# Altium PCB ESP32_HMI.PcbDoc
Units mm, origin at the board's own origin, x right, y up, seen from the top; angles counter-clockwise.
Board outline 93 x 70 mm, 2 copper layers (Top Layer, Bottom Layer); 93 components, 78 nets, 375 pads, 258 vias.
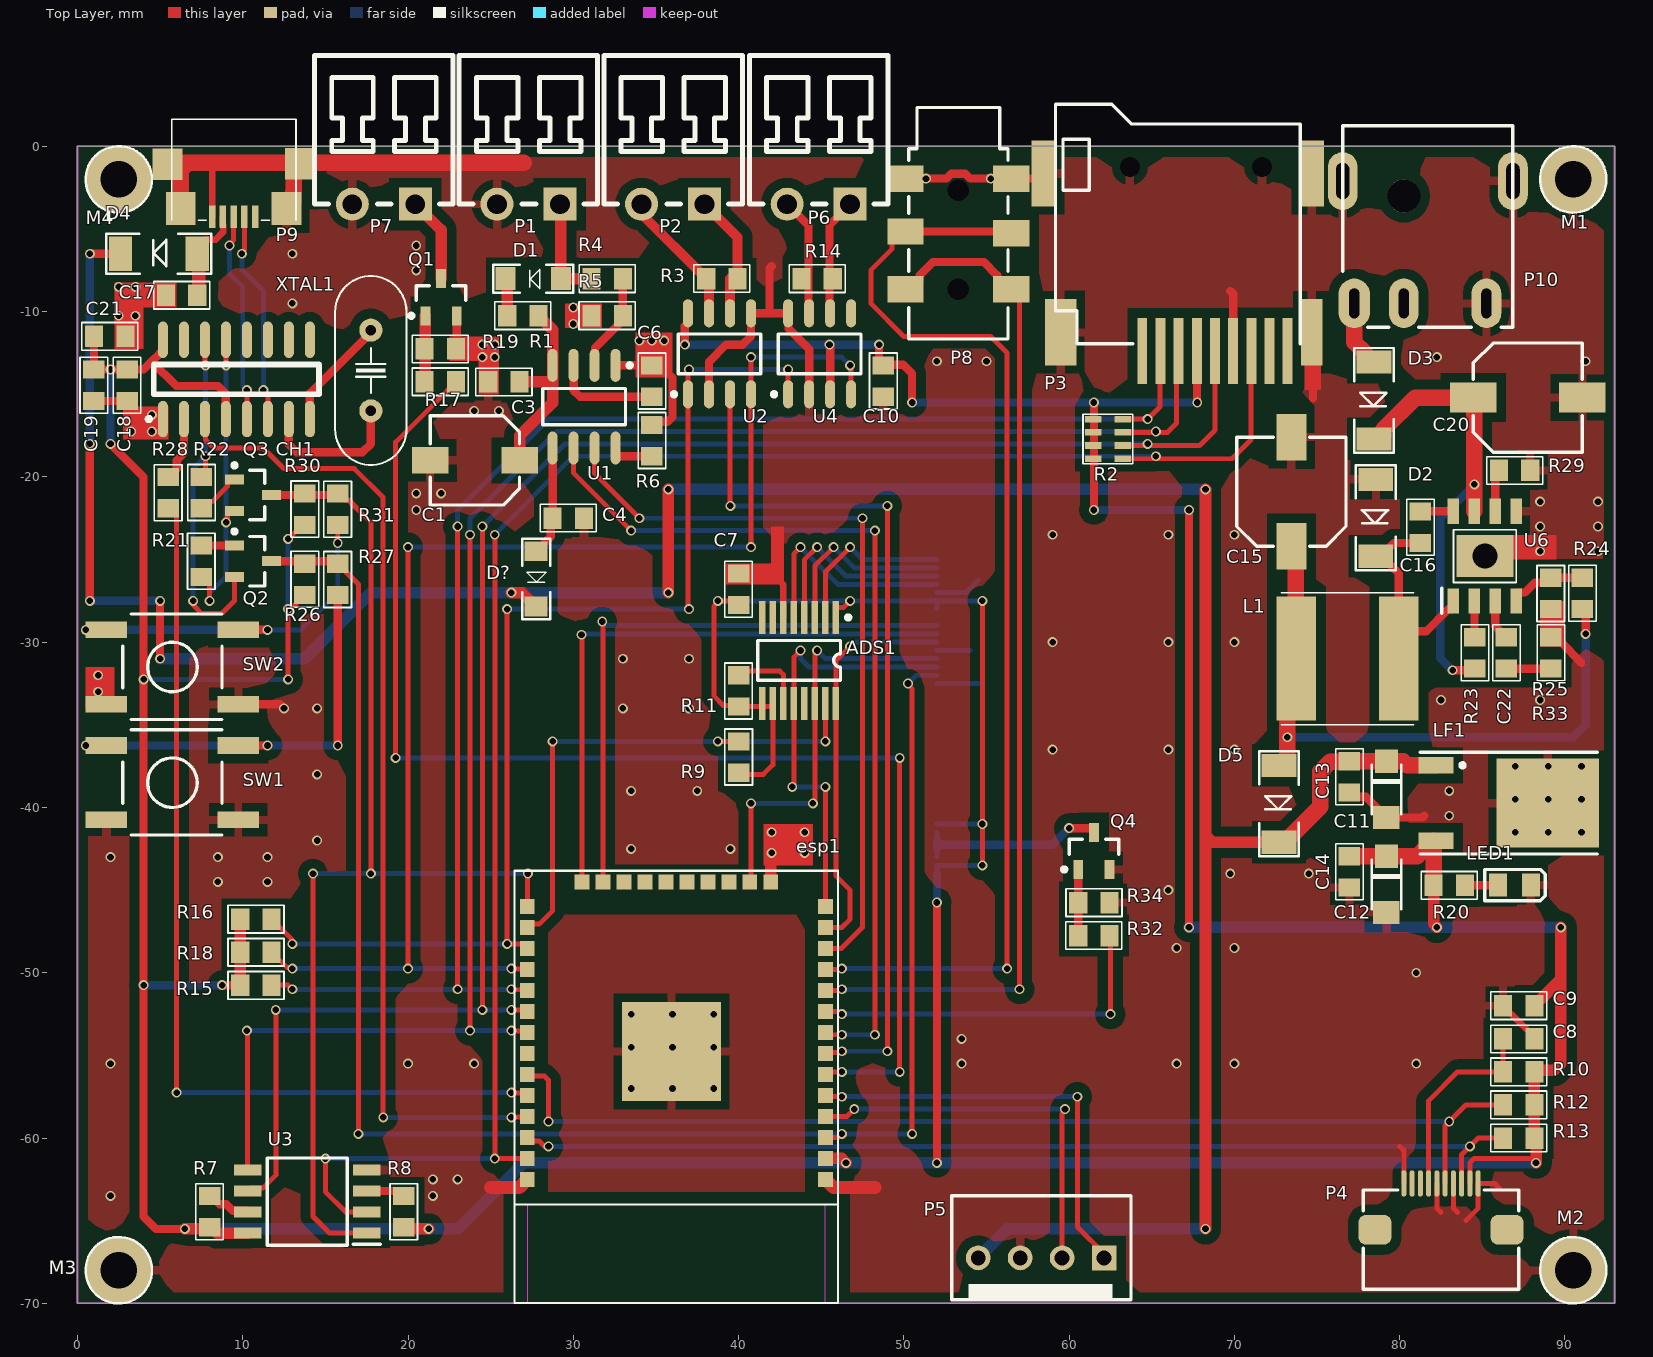
[diagram p0: Top Layer view]
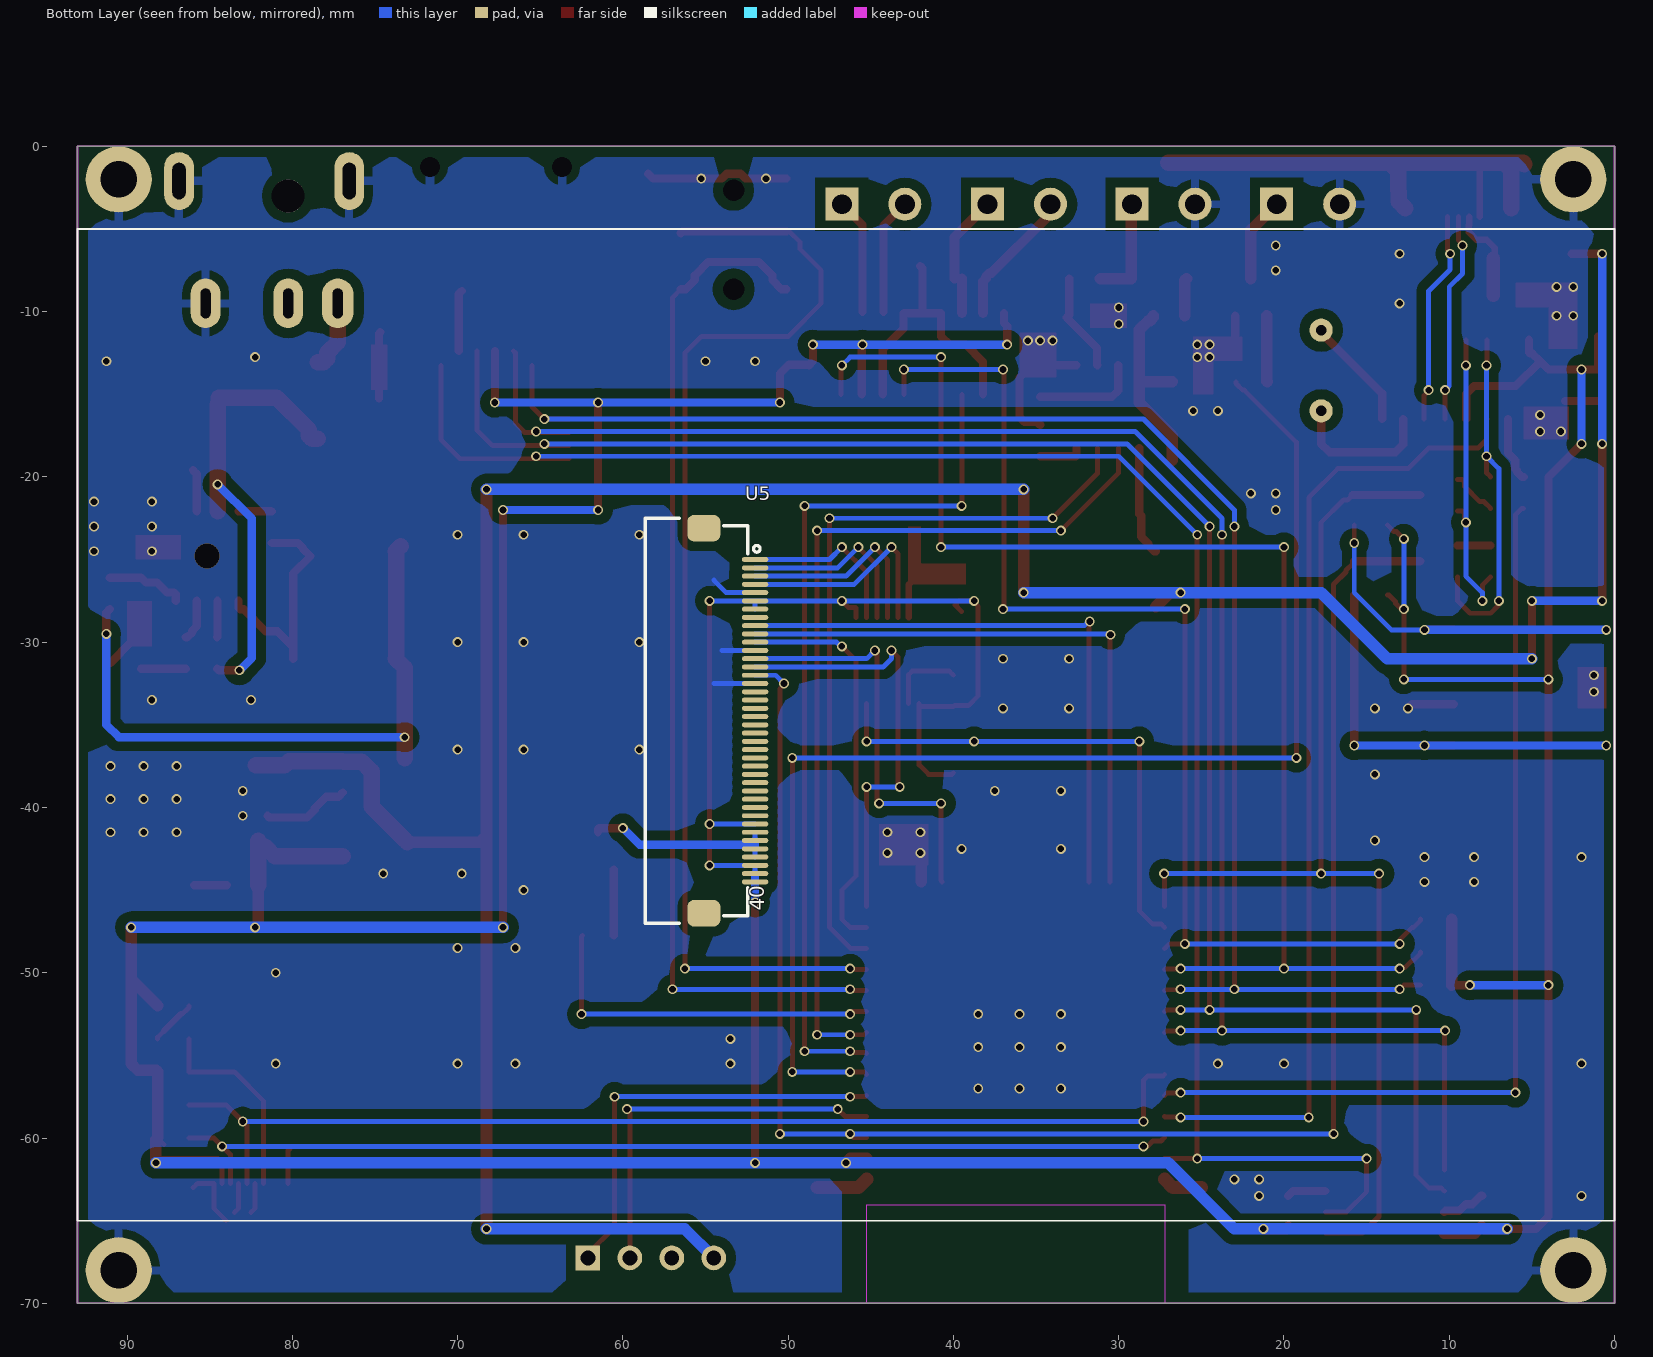
[diagram p1: Bottom Layer view, seen from below]
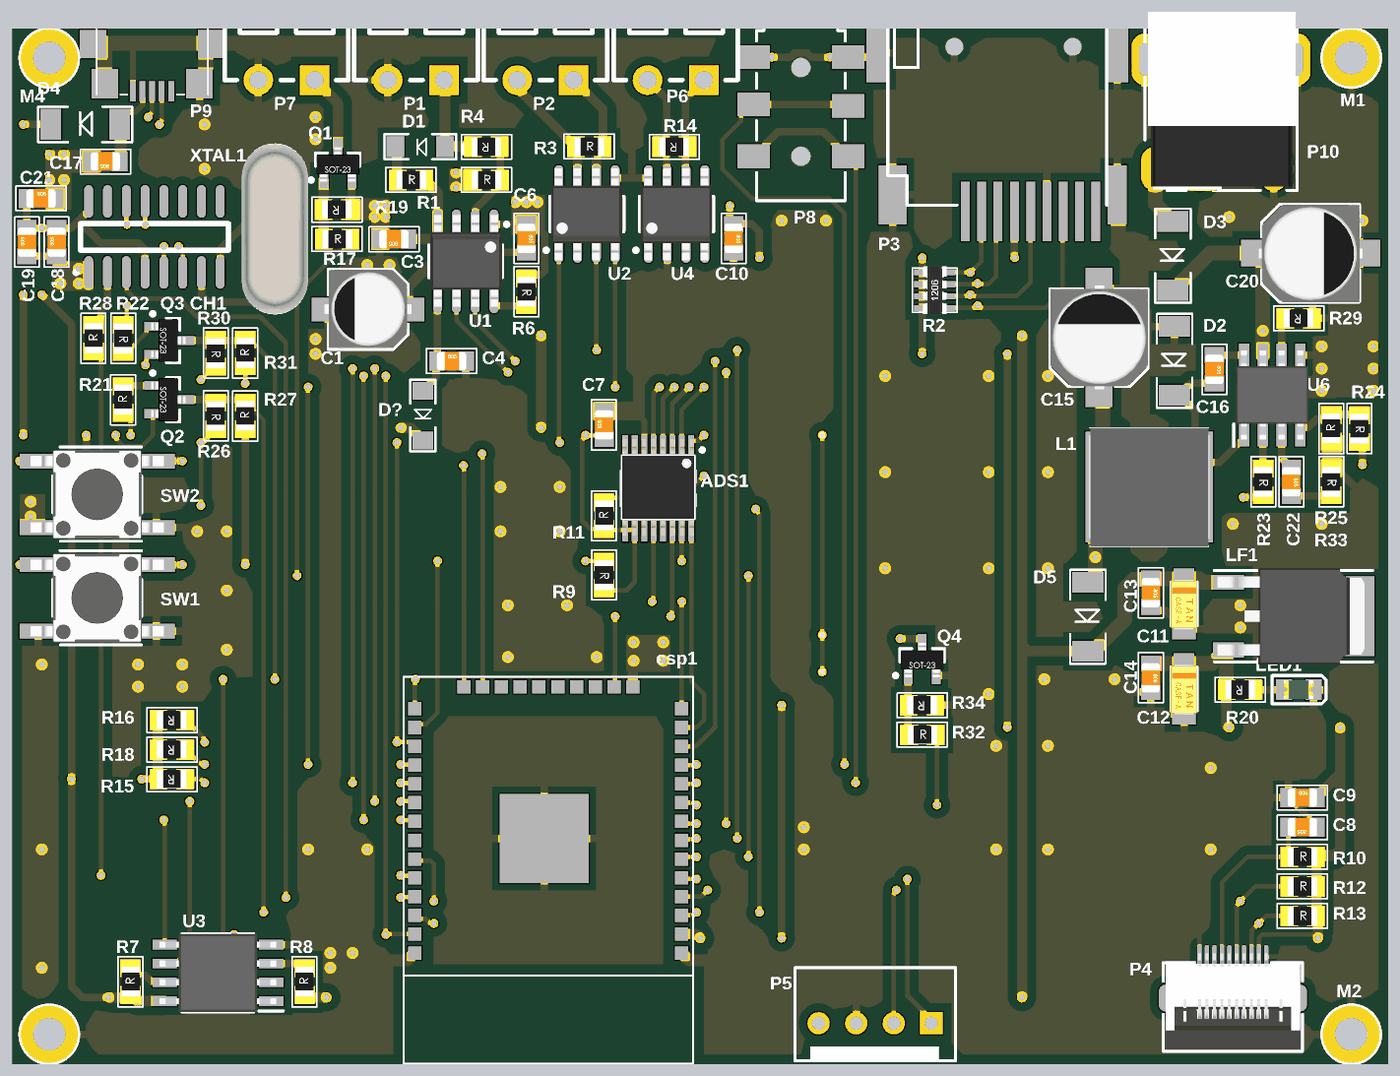
[diagram p2: 3D render of the assembled board from above, using the file's embedded part models]

## Layer stack, top to bottom
Top Solder: solder mask 0.0102, Solder Resist, Dk 3.5
Top Layer: signal copper 0.0356
Dielectric1: dielectric 0.32, FR-4, Dk 4.8
Bottom Layer: signal copper 0.0356
Bottom Solder: solder mask 0.0102, Solder Resist, Dk 3.5

## Board outline
0,-70 93,-70 93,0 0,0

## Design rules (kind name [scope] priority, off if disabled: settings)
Clearance [All] p1: gap=0.6 ignorepadtopadclearanceinfootprint=FALSE
FabricationTestPointUsage TestPointUsage [All] p1: valid=0 allowmultiple=FALSE
FabricationTestpoint Testpoint [All] p1: side=3 testpointundercomponent=TRUE minsize=1.016 maxsize=2.54 preferedsize=1.524 minholesize=0 maxholesize=1.016 preferedholesize=0.813 testpointgrid=0.025 allowsidetop=TRUE allowsidebottom=TRUE usegrid=TRUE gridtolerance=0
PolygonConnect [All] p1: thpad.connectstyle=Relief thpad.reliefconductorwidth=0.5 thpad.reliefentries=4 thpad.polygonreliefangle="90 Angle" thpad.airgapwidth=0.5 smdpad.connectstyle=Relief smdpad.reliefconductorwidth=0.5 smdpad.reliefentries=4 smdpad.polygonreliefangle="90 Angle" smdpad.airgapwidth=0.5 via.connectstyle=Direct via.reliefconductorwidth=0.254 via.reliefentries=4 via.polygonreliefangle="90 Angle" via.airgapwidth=0.254
RoomDefinition ESP32_HMI [InComponentClass('ESP32_HMI')] p1: confinementstyle=ConfineIn formatcopy=TRUE lockcomponents=FALSE outline -48.768,-116.883 2.032,-116.883 2.032,-91.483 -48.768,-91.483
RoutingVias [All] p1: holewidth=0.5 width=0.5 viastyle="Through Hole" minholewidth=0.2 minwidth=0.2 maxholewidth=10 maxwidth=10
SilkToSolderMaskClearance SilkscreenOverComponentPads [IsPad] p1: minsilkscreentomaskgap=0.254 clearancetoexposedcopper=TRUE
SolderMaskExpansion [All] p1: expansion=0.102 istentingtop=FALSE
Width [All] p1: maxlimit=10 minlimit=0.1 preferedwidth=0.5
27 further rules are at their usual default settings.

## Components (designator, comment, footprint, x,y, rotation, side; value= is the part's Value field where it differs from the comment)
ADS1 "ADS7846E" DBQ016 43.663,-31.1 r180 top
C1 "33uf" "CAP ELEC_TYPE-C" 24.05,-19 r90 top
C3 "10nF" "CAP 0805" 25.8,-14.25 r180 top
C4 "100nF" "CAP 0805" 29.7,-22.5 r0 top
C6 "100nF" "CAP 0805" 34.75,-14.2 r270 top
C7 "100nF" SMD_CAP_0805 40,-26.8 r90 top
C8 "100nF" "CAP 0805" 87.2,-54 r180 top
C9 "100nF" "CAP 0805" 87.2,-52 r0 top
C10 "100nF" "CAP 0805" 48.75,-14.2 r270 top
C11 "10uf" "CAP TAN_TYPE-A" 79.2,-38.9 r270 top
C12 "10uf" "CAP TAN_TYPE-A" 79.2,-44.65 r270 top
C13 "10nF" "CAP 0805" 76.95,-38.15 r270 top
C14 "100nF" "CAP 0805" 76.95,-43.9 r270 top
C15 "47uf" "CAP ELEC_TYPE-D&D8" 73.45,-20.9 r0 top
C16 "100nF" "CAP 0805" 81.25,-23.05 r270 top
C17 "10UF" SMD_CAP_0805 6.3,-9 r180 top
C18 "10uf" SMD_CAP_0805 3,-14.45 r90 top
C19 "100nF" SMD_CAP_0805 1,-14.45 r90 top
C20 "220uf" "CAP ELEC_TYPE-D&D8" 87.75,-15.2 r270 top
C21 "100nF" SMD_CAP_0805 1.95,-11.5 r0 top
C22 "220pF" "CAP 0805" 86.45,-30.65 r270 top
CH1 "CH340C" 751B-03_N 9.615,-14.1 r90 top
D1 "1N4148_SMD" SOD-80 29.25,-8 r180 top
D2 "SS14" SMA 78.55,-20.15 r270 top
D3 "SS14" SMA 78.45,-13.05 r270 top
D4 "SS14" SMA 7.25,-6.5 r180 top
D5 "SS14" SMA 72.7,-37.45 r270 top
D? "1N4148_SMD" SOD-80 27.75,-24.5 r270 top
esp1 "ESP32S_Module" ESP32S 45.25,-44.466 r180 top
L1 "10uH" "IND 23" 76.85,-31 r180 top
LED1 "LED-G" LED_G_0805 86.95,-44.7 r0 top
LF1 "LF33" TO-252 85.575,-39.735 r270 top
M1 "Screw" "Board Screw_No Silk" 90.5,-2 r0 top
M2 "Screw" "Board Screw_No Silk" 90.5,-68 r0 top
M3 "Screw" "Board Screw_No Silk" 2.5,-68 r0 top
M4 "Screw" "Board Screw_No Silk" 2.5,-2 r0 top
P1 "PTR2-R3.81" PTR2R-3.81 29.19,-3.5 r180 top
P2 "PTR2-R3.81" PTR2R-3.81 37.94,-3.5 r180 top
P3 "MICRO_SD-SOCKET" MICRO_SD 64.425,-12.375 r0 top
P4 "FPC_0.5mm_10" FPC50_10 82.5,-62.75 r180 top
P5 "SIG-4M" SIG4M 62.12,-67.25 r180 top
P6 "PTR2-R3.81" PTR2R-3.81 46.75,-3.5 r180 top
P7 "PTR2-R3.81" PTR2R-3.81 20.44,-3.5 r180 top
P8 "PJ313_3.5mm_JACK_STEREO" PJ-313 50.3,-11.65 r0 top value=?
P9 "USB MICRO" MICRO_USB 10.75,-4.25 r180 top
P10 "POWER JACK2" POWER10 80.25,-9.5 r270 top
Q1 "2N3904" SOT23 22,-9.125 r90 top
Q2 "2N3904" SOT23 10.625,-25.1 r0 top
Q3 "2N3904" SOT23 10.625,-21.1 r0 top
Q4 "2N3904" SOT23 61.5,-42.625 r90 top
R1 "560R" "RES 0805" 26.95,-10.25 r0 top
R2 "1K" "RES ARRAY 1206" 62.35,-17.7 r90 top
R3 "120R" "RES 0805" 38.99,-8 r0 top
R4 "22R" "RES 0805" 32.05,-8 r180 top
R5 "2.2M" "RES 0805" 32.05,-10.25 r0 top
R6 "100R" "RES 0805" 34.75,-17.8 r270 top
R7 "10K" "RES 0805" 8,-64.45 r90 top
R8 "10K" "RES 0805" 19.75,-64.45 r90 top
R9 "1K" "RES 0805 (2012X06L)" 40,-36.95 r270 top
R10 "10K" "RES 0805" 87.2,-56 r0 top
R11 "10K" "RES 0805 (2012X06L)" 40,-32.95 r90 top
R12 "10K" "RES 0805" 87.2,-58 r0 top
R13 "10K" "RES 0805" 87.2,-60 r0 top
R14 "120R" "RES 0805" 44.75,-8 r180 top
R15 "33k" "RES 0805" 10.8,-50.75 r180 top
R16 "33k" "RES 0805" 10.8,-46.75 r180 top
R17 "1k" "RES 0805" 21.95,-14.25 r0 top
R18 "33k" "RES 0805" 10.8,-48.75 r180 top
R19 "10k" "RES 0805" 21.95,-12.25 r180 top
R20 "1K" "RES 0805" 83,-44.7 r180 top
R21 "12k" "RES 0805" 7.5,-25.1 r90 top
R22 "12k" "RES 0805" 7.5,-20.95 r270 top
R23 "100K" "RES 0805" 84.55,-30.65 r270 top
R24 "150K" "RES 0805" 91.05,-27.05 r270 top
R25 "39K" "RES 0805" 89.15,-27.05 r90 top
R26 "12k" "RES 0805" 13.75,-26.2 r270 top
R27 "470" "RES 0805" 15.75,-26.2 r90 top
R28 "470" "RES 0805" 5.5,-20.95 r90 top
R29 "200K" "RES 0805" 86.95,-19.6 r180 top
R30 "12k" "RES 0805" 13.75,-21.95 r270 top
R31 "470" "RES 0805" 15.75,-21.95 r90 top
R32 "1k" "RES 0805" 61.5,-47.75 r0 top
R33 "68.1" "RES 0805" 89.15,-30.65 r270 top
R34 "10k" "RES 0805" 61.5,-45.75 r180 top
SW1 "Switch rst" SW-PB 5.742,-38.5 r180 top
SW2 "Switch prog" SW-PB 5.742,-31.5 r180 top
U1 "HT45B000X" SO8_NARROW_N 30.655,-15.75 r270 top
U2 "MAX485ESA" "SO8_NARROW_L - duplicate" 38.845,-12.55 r90 top
U3 "W25Q16BVSSIG" SOIC-8N 13.9,-63.845 r180 top
U4 "MCP2551-E/SN" "SO8_NARROW_L - duplicate" 44.905,-12.55 r90 top
U5 "TFT_LCD_4_INCH" TFT_LCD_40PIN_BUTTOM 52,-25 r90 bottom locked
U6 "MP1584EN-LF" SOIC8E 85.155,-24.788 r90 top
XTAL1 "12.000 MHz" "XTAL Small" 17.75,-13.56 r270 top

## Footprints (in the part's own frame and the unit in brackets; to place one, negate y for a bottom-side part, rotate by r counter-clockwise, add the part's x,y. Pads: shape width x height; smd on the part's side, far side on the other; paste and mask are expansions set on the pad)
751B-03_N [mm] "SOIC, 16-Leads, Body 9.9x3.9mm, Pitch 1.27mm, IPC Medium Density"
  oval 2.2x0.6 smd: 1(-2.4,4.445) 2(-2.4,3.175) 3(-2.4,1.905) 4(-2.4,0.635) 5(-2.4,-0.635) 6(-2.4,-1.905) 7(-2.4,-3.175) 8(-2.4,-4.445) 9(2.4,-4.445) 10(2.4,-3.175) 11(2.4,-1.905) 12(2.4,-0.635) 13(2.4,0.635) 14(2.4,1.905) 15(2.4,3.175) 16(2.4,4.445)
  silkscreen extent -2.52,-5 0.9,5.42, body extent -1.95,-4.95 1.95,4.95, height 1.75
"Board Screw_No Silk" [mm]
  round 4 hole 2.2 mask+0.1: S(0,0)
  silkscreen extent -2.01,-2.01 2.01,2.01
"CAP 0805" [mm]
  rect 1.1x1.3 smd: 1(-0.95,0) 2(0.95,0)
  silkscreen extent -1.7,-0.83 1.69,0.84, body extent -1,-0.62 1,0.62, height 0.78
"CAP ELEC_TYPE-C" [mm]
  rect 1.6x2.2 smd: 1(0,-2.7) 2(0,2.7)
  silkscreen extent -2.7,-2.7 2.7,2.7, body extent -2.63,-2.95 2.67,2.95, height 5.41
"CAP ELEC_TYPE-D&D8" [mm]
  rect 1.8x2.8 smd: 1(0,-3.3) 2(0,3.3)
  silkscreen extent -3.3,-3.3 3.3,3.3, body extent -3.27,-3.5 3.33,3.5, height 5.41
"CAP TAN_TYPE-A" [mm]
  rect 1.4x1.4 smd: 1(-1.7,0)
  rect 1.4x1.6 smd: 2(1.7,0)
  silkscreen extent -1.5,-0.9 1.5,0.9, body extent -1.65,-0.9 1.75,0.9, height 1.8
DBQ016 [mm] "SSOP; 16 Leads; Body Width 3.9 mm; Pitch 0.635 mm"
  rect 0.4x2 smd: 1(-2.222,-2.6) 2(-1.587,-2.6) 3(-0.952,-2.6) 4(-0.317,-2.6) 5(0.318,-2.6) 6(0.953,-2.6) 7(1.588,-2.6) 8(2.223,-2.6) 9(2.222,2.6) 10(1.587,2.6) 11(0.952,2.6) 12(0.317,2.6) 13(-0.318,2.6) 14(-0.953,2.6) 15(-1.588,2.6) 16(-2.223,2.6)
  silkscreen extent -3.1,-2.72 2.5,1.2, body extent -2.55,-3.32 2.55,3.18, height 1.06
ESP32S [mm] "ESP32S-Module"
  rect 0.9x0.9 smd: 1(0,18.034) 2(0,16.764) 3(0,15.494) 4(0,14.224) 5(0,12.954) 6(0,11.684) 7(0,10.414) 8(0,9.144) 9(0,7.874) 10(0,6.604) 11(0,5.334) 12(0,4.064) 13(0,2.794) 14(0,1.524) 15(3.3,0.034) 16(4.57,0.034) 17(5.84,0.034) 18(7.11,0.034) 19(8.38,0.034) 20(9.65,0.034) 21(10.92,0.034) 22(12.19,0.034) 23(13.46,0.034) 24(14.73,0.034) 25(18.034,1.524) 26(18.034,2.794) 27(18.034,4.064) 28(18.034,5.334) 29(18.034,6.604) 30(18.034,7.874) 31(18.034,9.144) 32(18.034,10.414) 33(18.034,11.684) 34(18.034,12.954) 35(18.034,14.224) 36(18.034,15.494) 37(18.034,16.764) 38(18.034,18.034)
  rect 6x6 smd: 101(9.3,10.3)
  Keep-Out Layer region: 0,19.558 18.034,19.558 18.034,25.527 0,25.527
  silkscreen extent -0.76,-0.64 18.8,25.53, body extent 0,0 18.03,25.53, height 2
FPC50_10 [mm] "FPC, 0.50mm, SMT,RA Bot. Contact, WE 687110149022"
  oval 0.3x1.6 smd mask+0.05: 1(2.25,0) 2(1.75,0) 3(1.25,0) 4(0.75,0) 5(0.25,0) 6(-0.25,0) 7(-0.75,0) 8(-1.25,0) 9(-1.75,0) 10(-2.25,0)
  rrect50% 2x1.8 smd: ""(-4,2.8) ""(4,2.8)
  silkscreen extent -4.7,0.4 4.7,6.4, body extent -4.55,-0.22 4.55,6.27, height 2.25
"IND 23" [mm]
  rect 2.4x7.5 smd: 1(-3.1,0) 2(3.1,0)
  silkscreen extent -4,-4 4,4, body extent -4.06,-4 4.06,4, height 6.6
LED_G_0805 [mm]
  rect 1.1x1.4 smd: 1(-1,0) 2(1,0)
  silkscreen extent -1.8,-0.95 1.85,0.95, body extent -1,-0.62 1,0.62, height 0.8
MICRO_SD [mm]
  rect 1.5x4 smd: 0(-5.95,10.725) 0(10.25,10.725)
  rect 1.9x4 smd: 0(-4.925,1.125)
  round 0 hole 1.2: 0(-0.75,11.125) 0(7.25,11.125)
  rect 1.3x4 smd: 0(10.25,1.125)
  rect 0.6x4 smd: 1(0,0) 2(1.1,0) 3(2.2,0) 4(3.308,0) 5(4.4,0) 6(5.5,0) 7(6.6,0) 8(7.7,0) 9(8.8,0)
  silkscreen extent -5.25,0.43 9.55,14.92
MICRO_USB [mm]
  rect 0.4x1.35 smd: 1(0,0) 2(0.65,0) 3(1.3,0) 4(1.95,0) 5(2.6,0)
  rect 1.8x1.9 smd: 6(-2.7,-3.2) 6(5.3,-3.175)
  rect 1.8x2 smd: 6(-1.9,-0.5) 6(4.5,-0.5)
  silkscreen extent -2.47,-5.9 5.05,0.23
PJ-313 [mm]
  round 1 hole 1.3: 0(3,3) 0(3,9)
  rect 2.2x1.6 smd: 1(-0.2,9.7) 1(6.2,9.7) 2(-0.2,6.5) 2(6.2,6.4) 3(-0.2,3) 3(6.2,3)
  silkscreen extent 0,0 6,14, body extent 0,0 6,14, height 5
POWER10 [mm]
  oval 3.5x1.8 hole 0.8 slot 2.2 at 0 deg: 1(-7.4,6.6) 1(-7.4,-3.7)
  oval 3x1.8 hole 0.6 slot 1.8 at 0 deg: 1(0,5) 2(0,0)
  oval 3x1.9 hole 0.6 slot 1.8 at 0 deg: 3(0,-3)
  oval 2x1.9 hole 2: 4(-6.5,0)
  silkscreen extent -10.75,-3.7 1.45,6.6, body extent -10.6,-3.5 1.5,6.5, height 7.2
PTR2R-3.81 [mm]
  rect 2x2 hole 1.2: 1(0,0)
  round 2 hole 1.2: 2(3.81,0)
  silkscreen extent -2.28,-9 6.09,0
"RES 0805" [mm] "Chip Resistor, 2-Leads, Body 2.0x1.3mm, IPC High Density _ (0.100 W)"
  rect 1.1x1.3 smd: 1(-0.95,0) 2(0.95,0)
  silkscreen extent -1.7,-0.83 1.69,0.84, body extent -1.49,-0.7 1.51,0.7, height 0.53
"RES 0805 (2012X06L)" [mm] "Chip Resistor, 2-Leads, Body 2.0x1.3mm, IPC High Density _ (0.100 W)"
  rect 1.1x1.3 smd: 1(-0.95,0) 2(0.95,0)
  silkscreen extent -1.7,-0.83 1.69,0.84, body extent -1.49,-0.7 1.51,0.7, height 0.53
"RES ARRAY 1206" [mm]
  rect 0.4x1 smd: 1(-1.2,-0.9) 2(-0.4,-0.9) 3(0.4,-0.9) 4(1.2,-0.9) 5(1.2,0.9) 6(0.4,0.9) 7(-0.4,0.9) 8(-1.2,0.9)
  silkscreen extent -1.5,-1.51 1.49,1.51, body extent -1.6,-0.8 1.6,0.8, height 0.5
SIG4M [mm]
  rect 1.5x1.5 hole 0.9: 1(0,0)
  round 1.5 hole 0.9: 2(2.54,0) 3(5.08,0) 4(7.62,0)
  silkscreen extent -1.62,-3.76 9.23,2.54
SMA [mm]
  rect 1.4x2.1 smd: 1(0,0) 2(4.65,0)
  silkscreen extent -0.85,-1.2 5.5,1.2
SMD_CAP_0805 [mm]
  rect 1.1x1.3 smd: 1(-0.95,0) 2(0.95,0)
  silkscreen extent -1.7,-0.83 1.69,0.84, body extent -1,-0.62 1,0.62, height 0.78
"SO8_NARROW_L - duplicate" [mm] "8-Pin Small Outline Package (SO8), IPC High Density"
  oval 1.7x0.6 smd: 1(-2.45,1.905) 2(-2.45,0.635) 3(-2.45,-0.635) 4(-2.45,-1.905) 5(2.45,-1.905) 6(2.45,-0.635) 7(2.45,0.635) 8(2.45,1.905)
  silkscreen extent -2.57,-2.5 1.2,2.88, body extent -3.12,-2.39 3.07,2.44, height 1.7
SO8_NARROW_N [mm] "8-Pin Small Outline Package (SO8), IPC Medium Density"
  oval 2x0.6 smd: 1(-2.5,1.905) 2(-2.5,0.635) 3(-2.5,-0.635) 4(-2.5,-1.905) 5(2.5,-1.905) 6(2.5,-0.635) 7(2.5,0.635) 8(2.5,1.905)
  silkscreen extent -2.62,-2.5 1.1,2.88, body extent -3.12,-2.39 3.07,2.44, height 1.7
SOD-80 [mm]
  rect 1.2x1.4 smd: 1(0,0) 2(3.35,0)
  silkscreen extent -0.75,-0.85 4.1,0.85
SOIC8E [mm]
  rect 1.525x0.7 smd: 1(-2.712,1.905) 2(-2.712,0.635) 3(-2.712,-0.635) 4(-2.712,-1.905) 5(2.712,-1.905) 6(2.712,-0.635) 7(2.712,0.635) 8(2.712,1.905)
  rect 2.56x3.45 smd: 9(0,0)
  silkscreen extent -3.47,-1.9 1.6,2.61, body extent -3,-2.45 3,2.45, height 1.7
SOIC-8N [mm]
  rect 1.65x0.65 smd: 1(-3.6,1.905) 2(-3.6,0.635) 3(-3.6,-0.635) 4(-3.6,-1.905) 5(3.6,-1.905) 6(3.6,-0.635) 7(3.6,0.635) 8(3.6,1.905)
  silkscreen extent -4.43,-2.64 2.42,2.64, body extent -3.95,-2.64 3.95,2.64, height 2.16
SOT23 [mm] "SOT23, 3-Leads, Body 2.9x1.3mm, Pitch 0.95mm, Lead Span 2.4mm, IPC Medium Density"
  rect 1.15x0.6 smd: 1(-1.125,0.95) 2(-1.125,-0.95) 3(1.125,0)
  silkscreen extent -1.25,-1.5 0.7,1.92, body extent -1.23,-1.45 1.07,1.45, height 1
SW-PB [mm]
  rect 2.5x1 smd: 1(-3.992,2.25) 1(3.992,2.25) 2(-3.992,-2.25) 2(3.992,-2.25)
  silkscreen extent -3,-3.2 3,3.18, body extent -4.5,-3 4.5,3, height 5
TFT_LCD_40PIN_BUTTOM [mm] "FPC, FH12 Series; 40 Position; 0.5mm, Top Contact"
  oval 0.3x1.6 smd mask+0.05: 1(0,0) 2(-0.5,0) 3(-1,0) 4(-1.5,0) 5(-2,0) 6(-2.5,0) 7(-3,0) 8(-3.5,0) 9(-4,0) 10(-4.5,0) 11(-5,0) 12(-5.5,0) 13(-6,0) 14(-6.5,0) 15(-7,0) 16(-7.5,0) 17(-8,0) 18(-8.5,0) 19(-9,0) 20(-9.5,0) 21(-10,0) 22(-10.5,0) 23(-11,0) 24(-11.5,0) 25(-12,0) 26(-12.5,0) 27(-13,0) 28(-13.5,0) 29(-14,0) 30(-14.5,0) 31(-15,0) 32(-15.5,0) 33(-16,0) 34(-16.5,0) 35(-17,0) 36(-17.5,0) 37(-18,0) 38(-18.5,0) 39(-19,0) 40(-19.5,0)
  rrect50% 1.6x2 smd: ""(-21.4,3.1) ""(1.9,3.1)
  silkscreen extent -22,-0.3 2.5,6.64, body extent -22,-0.3 2.5,6.7, height 2.05
TO-252 [mm] "D-PAK/TO-252-AA; 3 Leads (1 Cropped); Body 10.1 (inc. leads) x 6.6 mm (LxW max)"
  rect 1x2.1 smd: 1(-2.285,-3.375) 3(2.285,-3.375)
  rect 5.4x6.2 smd: 4(0,3.375)
  silkscreen extent -3.08,-4.32 3.09,6.38, body extent -3.27,-4.11 3.27,5.83, height 2.39
"XTAL Small" [mil]
  round 55 hole 25: 1(-96.06,0) 2(96.06,0)
  silkscreen extent -225,-85 225,85, body extent -226,-89 226,89, height 140

## Part data
ADS1: "4-Wire Touch Screen Controller, 16-Pin SSOP", Code_JEDEC=MO-137-AB, ComponentLink1Description="Manufacturer Link", ComponentLink1URL=http://focus.ti.com/docs/prod/folders/print/ads7846.html, ComponentLink2Description=Datasheet, ComponentLink2URL=http://focus.ti.com/lit/ds/symlink/ads7846.pdf, DatasheetVersion=Jan-2005, PackageDescription="SSOP; 16 Leads; Body Width 3.9 mm; Pitch 0.635 mm", PackageReference=DBQ016, PackageVersion=Feb-2005, Published=6-Oct-2005, Publisher="Altium Limited"
C1 C11 C12: library part "CAPACITOR POLAR", "Polar Capacitor", Voltage=100V, Adding Date=1398/04/17, Designer="Amin lezgi"
C3 C4 C6 C8 C9 C10 C13 C14 C16 C22: library part "CAPACITOR BIPOLAR", "Bipolar Capacitor", Adding Date=1398/5/7, Designer="Amin Lezgi"
C7 C17 C18 C19 C21: library part Cap-Bipolar, "Bipolar Capacitor", Voltage=100V, Adding Date=1387/12/20, Designer="Saeid Jorablo", Organazation=ControTec
C15 C20: library part "CAPACITOR POLAR", "Polar Capacitor", Voltage=16V, Adding Date=1398/04/17, Designer="Amin lezgi"
CH1: library part CH340G
D2 D3 D4 D5: library part SS14_SMD, "SCHOTTKY DIODE_SMA", LatestRevisionDate=08-Jul-2005, LatestRevisionNote="Mech Layer 1 removed.", PackageReference=LED-0, Published=8-Jun-2000, Publisher="Altium Limited"
esp1: "Esp-32S", Datasheet=https://espressif.com/sites/default/files/documentation/esp_wroom_32_datasheet_en.pdf
L1: library part INDUCTOR
LED1: library part LED_SMD_GREEN, "LED_SMD", LatestRevisionDate=08-Jul-2005, LatestRevisionNote="Mech Layer 1 removed.", PackageReference=LED-0, Published=8-Jun-2000, Publisher="Altium Limited"
LF1: library part L78M05, "Precision 500mA Regulator"
M1 M2 M3 M4: library part "Board Screw", "Board Screw With Spacer"
P1 P2 P6 P7: library part PTR_RIGHT-2pin, "3.81mm"
P3: library part MICRO_SD
P4: library part FPC50_10, "CONN, FPC, 0.50mm pitch, RightAngle, Bot. Contact, Hinge type", DESC="LCD Touch", MANF="Wurth Elektronik", MANF_P#=687110149022
P5: "MALE"
P8: library part HEAD_PHONE_PJ313, "3.3mm audio jack stereo", PART NUMBER=?, Designer="amin lezgi"
P10: library part "POWER JACK", Designer=aminlezgi
Q1 Q2 Q3 Q4: library part "NPN BJT", Company="ADD COMPANY", Designer="AMIN LEZGI"
R1 R4 R5 R6 R7 R8 R10 R12 R13 R15 R16 R17 R18 R19 R20 R21 R22 R23 R26 R27 R28 R29 R30 R31 R32 R33 R34: library part RESISTOR, "RESISTOR", Power="1/8 W", Tolerance=5%
R2: library part "RESISTOR ARRAY"
R3 R14: library part RESISTOR, "RESISTOR", Power="1/8 W", Tolerance=1
R9 R11: library part Resistor, "Resistor", Power="1/8 W", Tolerance=5%
R24 R25: library part RESISTOR, "RESISTOR", Power="1/8 W", Tolerance=1%
SW1 SW2: library part "Switch PB", "Push Button Switch"
U1: "Complete Data Transmission on Power Line / functions", Designer="Amin Lezgi"
U2: "Low-Power, Slew-Rate-Limited RS-485/RS-422 Transceiver", Code_IPC=SOIC127P600-8, Code_JEDEC=MS-012-AA, ComponentLink1Description="Manufacturer Link", ComponentLink1URL=http://www.maxim-ic.com/, ComponentLink2Description=Datasheet, ComponentLink2URL=http://pdfserv.maxim-ic.com/en/ds/MAX1487-MAX491.pdf, DatasheetVersion=Feb-1996, LatestRevisionDate=13-Apr-2006, LatestRevisionNote="IPC-7351 Footprint Added.", PackageDescription="8-Pin Small Outline Integrated Circuit 1.27 mm Pitch", PackageReference=NSO8, Published=16-Jan-2001, Publisher="Altium Limited"
U3: library part W25Q16BVSSIG_TR, "Integrated Circuit", Manufacturer_Name=Winbond, Manufacturer_Part_Number="W25Q16BVSSIG TR", Mouser Part Number=N/A, Datasheet Link=https://media.digikey.com/pdf/Data%20Sheets/Winbond%20PDFs/W25Q16BV.pdf, Designer="amin lezgi", Height=2.16mm, Mouser Price/Stock=https://www.mouser.com/Search/Refine.aspx?Keyword=N%2FA
U4: "High-Speed CAN Transceiver, 8-Pin SOIC, Extended Temperature", Supplier Part Number 1=MCP2551-E/SN-ND, Code_IPC=SOIC127P600-8, Code_JEDEC=MS-012, ComponentLink1Description=Datasheet, ComponentLink1URL=http://ww1.microchip.com/downloads/en/DeviceDoc/21667E.pdf, ComponentLink2Description="Packaging Specification", ComponentLink2URL=http://www.microchip.com/stellent/groups/techpub_sg/documents/packagingspec/en012702.pdf, ComponentLink3Description="Microchip.com Home", ComponentLink3URL=http://www.microchip.com/, DatasheetVersion="revE, Jan-2007", PackageDescription="8-Lead Plastic Small Outline (SN) - Narrow, 3.90mm Body [SOIC]", PackageReference=SOIC-SN8, PackageVersion="revBB, Aug-2009", Published=29-Jan-2009, Publisher="Altium Limited", Supplier 1=Digi-Key, Supplier 2=Farnell, Supplier 3=Farnell, Supplier Part Number 2=1467746, Supplier Part Number 3=4687887
U5: "TFT LCD 4 inch - 320x480 With Touch - 3Line-SPI/4 Line-SPI/8bit/16bit interface ST7796S", MANF=Hirose, MANF_P#=FH12A-40S-0.5SH
U6: "Integrated Circuit", Manufacturer_Name="Monolithic Power Systems (MPS)", Mouser Part Number=946-MP1584ENLF, Arrow Part Number=MP1584EN-LF, Datasheet Link=https://componentsearchengine.com/Datasheets/1/MP1584EN-LF.pdf, Designer="amin lezgi", Height=1.7mm, Manufacturer_Part_Number=MP1584EN-LF, Mouser Price/Stock=https://www.mouser.com/Search/Refine.aspx?Keyword=946-MP1584ENLF
XTAL1: library part XTAL, "XTAL Crystal", Company=E.P.I.L, Design Date=11/04/2011
D1 D?: LatestRevisionDate=08-Jul-2005, LatestRevisionNote="Mech Layer 1 removed.", PackageReference=LED-0, Published=8-Jun-2000, Publisher="Altium Limited"

## Via types
v1: diameter 0.6, hole 0.4, Top Layer to Bottom Layer, 257 vias
v2: diameter 1.5, hole 1.5, Top Layer to Bottom Layer, 1 vias

## Nets (pads, with @x,y where several pads share a name; then routed paths per layer and width w, separated by ;. In a path a pad name is that pad's centre, name@x,y a point inside that pad or via, vN(x,y) a via of type N, cw(c..) or ccw(c..) an arc to the next point about the centre after c; other vN are vias at no path point)
#EN: esp1.3 Q2.3 R26.1 R27.2 U5.15 | length 103
  Top Layer w0.3: R27.2 15.85,-25.25 16.25,-25.65 16.25,-25.75 17,-26.5 v1(17,-59.75) ; esp1.3 46.04,-59.96 v1(46.25,-59.75) ; v1(50.25,-32.5) 50.25,-32.576 50.5,-32.826 v1(50.5,-59.75)
  Top Layer w0.5: Q2.3 R27.2@15.75,-25.1
  Bottom Layer w0.3: v1(17,-59.75) v1(46.25,-59.75) v1(50.5,-59.75) ; v1(50.25,-32.5) 50.75,-32 U5.15
+3.3V: ADS1.1 ADS1.9 ADS1.10 C7.1 C9.2 C10.1 C12.1 C14.1 C18.2 C19.2 C21.1 CH1.4 CH1.16 esp1.2 LF1.3 P3.4 P4.9 R2.5 R2.6 R2.7 R2.8 R7.1 R8.1 R9.2 R10.2 R11.1 R12.2 R13.2 R15.2 R16.2 R18.2 R20.2 R26.2 R30.2 U2.8 U3.8 U4.3 U5.6 U5.7 U5.33 U5.38 U5.39 U5.40 | length 400.5
  Top Layer w0.3: v1(12.75,-32.25) v1(12.75,-28) ; v1(12.75,-23.75) 13.2,-23.3 13.35,-23.3 R30.2 ; v1@12.957,-27.943 13.25,-27.65 13.25,-27.55 13.65,-27.15 R26.2 ; C7.1@39.5,-28.15 39.9,-27.75 39.65,-27.5 v1(38.75,-27.5) 38.75,-27.576 38.5,-27.826 38.5,-33.25 39.076,-33.826 39.926,-33.826 R11.1 42.025,-33.9 ADS1.10@42.075,-33.85 ; R9.2 40.1,-38 41.5,-38 42.075,-37.425 ADS1.10@42.075,-33.85 ; ADS1.10 ADS1.10@42.075,-33.85 ; ADS1.1 45.885,-27.941 45.935,-27.891 46.359,-27.891 v1(46.75,-27.5) ; v1(54.75,-43.5) v1(54.75,-41) v1(54.75,-27.5) ; P4.9 84.25,-61.5 84.5,-61.25 v1@88.25,-61.25 ; R13.2@87.75,-60.4 R13.2
  Top Layer w0.5: C21.1 C19.2 v1(2,-13.5) C18.2 4,-13.5 4.49,-13.01 ; v1(2,-18) 4,-20 v1(4,-32.25) v1(4,-50.75) 4,-64.75 4.75,-65.5 v1(6.5,-65.5) ; CH1.16 5.17,-12.473 5.124,-12.519 4.981,-12.519 4.49,-13.01 ; v1(8.75,-50.75) R15.2 ; CH1.4 8.98,-14.98 8.5,-14.5 5.981,-14.5 4.49,-13.01 ; v1(36.75,-12) 36.75,-10.867 36.94,-10.677 U2.8 ; v1(45.5,-12) 45.54,-12.04 U4.3 ; v1(48.5,-12) 48.5,-13 C10.1 48.793,-13.207 49.957,-13.207 50.5,-13.75 v1(50.5,-15.5) ; v1(52,-61.5) v1(52,-45.75) ; v1(61.5,-22) v1(61.5,-15.5) ; v1(67.25,-47.25) v1(67.25,-22) ; P3.4 67.733,-15.483 v1(67.75,-15.5)
  Top Layer w0.7: v1(6.5,-65.5) 7.9,-65.5 R7.1 8.1,-65.4 8.45,-65.75 U3.8 ; R15.2 R18.2 R16.2 ; R8.1 19.85,-65.5 v1(21.25,-65.5) ; esp1.2 45.252,-61.232 46.232,-61.232 v1(46.5,-61.5) ; R20.2 82.05,-47.05 v1(82.25,-47.25) ; C9.2 89.75,-50.4 ; v1(88.25,-61.5) 88.25,-61.25 88.25,-60.1 R13.2 R12.2 R10.2 88.24,-55.91 89.34,-55.91 89.75,-55.5 89.75,-50.4 ; v1(89.75,-47.25) 89.75,-50.4
  Top Layer w1: C14.1 C12.1 81.064,-42.95 LF1.3@81.65,-42.364 ; R20.2 LF1.3@82.05,-42.02
  Bottom Layer w0.3: v1(4,-32.25) v1(12.75,-32.25) ; v1(12.75,-28) v1(12.75,-23.75) ; v1(38.75,-27.5) v1(46.75,-27.5) 51.35,-27.5 U5.6 ; U5.39 U5.38 52.65,-43.5 v1(54.75,-43.5) ; U5.33 v1(54.75,-41) ; U5.7 U5.6 ; v1(54.75,-27.5) U5.6
  Bottom Layer w0.5: v1(2,-18) v1(2,-13.5) ; v1(4,-50.75) v1(8.75,-50.75) ; v1(36.75,-12) v1(45.5,-12) v1(48.5,-12) ; v1(50.5,-15.5) v1(61.5,-15.5) v1(67.75,-15.5) ; v1(52,-45.75) U5.40 U5.39 ; v1(61.5,-22) v1(67.25,-22)
  Bottom Layer w0.7: v1(6.5,-65.5) v1(21.25,-65.5) 23,-65.5 27,-61.5 v1(46.5,-61.5) v1(52,-61.5) v1(88.25,-61.5) ; v1(67.25,-47.25) v1(82.25,-47.25) v1(89.75,-47.25)
+5V: C15.1 D5.1 L1.2 R24.2 | length 38.6
  Top Layer w0.5: R24.2 91.25,-28.2 v1(91.25,-29.5)
  Top Layer w1: D5.1@73.2,-37.01 v1(73.2,-35.75) 73.2,-31.55 L1.2 ; C15.1 73.75,-24.5 73.7,-24.55 L1.2@73.7,-31
  Bottom Layer w0.5: v1(73.2,-35.75) 90.5,-35.75 91.25,-35 v1(91.25,-29.5)
+24V: D3.1 P10.3 | length 4.3
  Top Layer w1: P10.3 77.25,-11.85 77.9,-12.5 77.9,-12.85 78.1,-13.05 D3.1
"BL LED-": Q4.3 U5.34 U5.35 U5.36 U5.37 | length 11.6
  Top Layer w0.5: v1(60,-41.25) 61.45,-41.25 61.5,-41.3 Q4.3
  Bottom Layer w0.3: U5.37 U5.36 ; U5.35 U5.34
  Bottom Layer w0.5: U5.36 52,-42.25 ; U5.35 52,-42.25 ; v1(60,-41.25) 59,-42.25 52,-42.25
CAN1_RX: esp1.28 R18.1 U2.4 U4.4 | length 81.7
  Top Layer w0.3: R18.1 11.75,-48.85 12.15,-49.25 12.25,-49.25 12.693,-49.693 12.943,-49.693 v1(13,-49.75) ; v1(20,-49.75) v1(20,-24.25) ; v1(26.25,-49.75) 26.28,-49.78 27.196,-49.78 esp1.28 ; v1(40.75,-24.25) U2.4 v1(40.75,-12.75) ; U4.4 v1@46.81,-13.25
  Bottom Layer w0.3: v1(13,-49.75) v1(20,-49.75) v1(26.25,-49.75) ; v1(20,-24.25) v1(40.75,-24.25) ; v1(40.75,-12.75) 46.25,-12.75 v1(46.75,-13.25)
CAN1_TX: esp1.27 R16.1 U2.1 U4.1 | length 69.7
  Top Layer w0.3: R16.1 11.75,-46.85 12.15,-47.25 12.25,-47.25 12.943,-47.943 12.943,-48.193 v1(13,-48.25) ; v1(26,-28) v1(26,-48.25) 26.936,-48.25 esp1.27 ; v1(37,-28) 36.94,-27.94 U2.1 36.94,-13.641 37,-13.581 v1(37,-13.5) ; U4.1 v1(43,-13.5)
  Bottom Layer w0.3: v1(13,-48.25) v1(26,-48.25) ; v1(26,-28) v1(37,-28) ; v1(37,-13.5) v1(43,-13.5)
D_N: CH1.6 P9.2 | length 13
  Top Layer w0.3: v1(9.95,-6.5) 9.95,-6.419 10.1,-6.269 P9.2 ; v1(11.25,-14.75) 11.25,-14.794 11.52,-15.064 CH1.6
  Bottom Layer w0.3: v1(9.95,-6.5) 9.95,-7.45 11.25,-8.75 v1(11.25,-14.75)
D_P: CH1.5 P9.3 | length 12.8
  Top Layer w0.3: v1(9.2,-6) 9.2,-5.924 9.45,-5.674 P9.3 ; CH1.5 v1(10.25,-14.75)
  Bottom Layer w0.3: v1(9.2,-6) 9.2,-7.7 10,-8.5 10,-14.5 v1(10.25,-14.75)
DAC_1: esp1.10 P8.3 | length 62.5
  Top Layer w0.3: esp1.10 45.256,-51.064 46.105,-51.064 46.169,-51 v1(46.25,-51) ; P8.3@56.5,-8.65 57,-9.15 v1(57,-51)
  Top Layer w0.5: P8.3@50.1,-8.65 50.4,-8.65 50.95,-8.1 50.95,-7.8 51.75,-7 54.85,-7 55.65,-7.8 55.65,-8.1 56.2,-8.65 P8.3@56.5,-8.65
  Bottom Layer w0.3: v1(46.25,-51) v1(57,-51)
DAC_2: esp1.11 P8.2 | length 69.5
  Top Layer w0.3: esp1.11 46.2,-49.8 v1(46.25,-49.75) ; P8.2@50.1,-5.15 49.926,-5.15 49.276,-5.8 49.276,-6.224 48,-7.5 48,-9.5 50,-11.5 55.25,-11.5 56.25,-12.5 v1(56.25,-49.75)
  Top Layer w0.5: P8.2@50.1,-5.15 56.4,-5.15 P8.2@56.5,-5.25
  Bottom Layer w0.3: v1(46.25,-49.75) v1(56.25,-49.75)
DTR: CH1.13 Q3.2 R21.1 | length 18.9
  Top Layer w0.3: R21.1 8,-26.55 v1(8,-27.5) ; CH1.13 8.98,-13.23 v1(9,-13.25) ; v1(9,-22.75) 9,-22.55 9.075,-22.475 9.075,-22.2 9.225,-22.05 Q3.2
  Bottom Layer w0.3: v1(8,-27.5) 8,-27 9,-26 v1(9,-22.75) v1(9,-13.25)
GND: ADS1.6 C1.2 C3.2 C4.2 C6.1 C7.2 C8.1 C9.1 C10.2 C11.2 C12.2 C13.2 C14.2 C15.2 C17.2 C18.1 C19.1 C20.2 C21.2 CH1.1 D2.1 esp1.1 esp1.15 esp1.38 esp1.101 LED1.2 LF1.4 M1.S M2.S M3.S M4.S P1.2 P3.0 P3.6 P4.1 P4.5 P4.7 P4.10 P5.3 P7.2 P8.1 P9.5 P9.6 P10.1 Q1.2 Q4.2 R5.1 R6.1 R19.1 R25.1 R29.1 R33.1 R34.1 SW1.1 SW2.1 U1.1 U2.2 U2.5 U3.4 U4.2 U4.8 U5.5 U5.12 U5.16 U6.5 U6.9 | length 118.2
  Top Layer w0.3: 80,-60.5 80.25,-60.75 P4.1 ; P4.5 82.25,-64.25 82.5,-64.5 ; P4.7 83.25,-64.25 83.5,-64.5 ; 84,-65 84.75,-64.25 P4.10 85.75,-62.75 86,-63 ; C9.1 86.25,-52.1 86.65,-52.5 C9.1@86.75,-52.5 ; C8.1@87.75,-53.5 88.15,-53.9 C8.1
  Top Layer w0.4: 8,-1 8.15,-1.15 P9.5 ; 42.25,-26 42.55,-26.3 42.55,-26.374 42.71,-26.534 ADS1.6 ; C9.1@86.75,-52.5 C8.1@87.75,-53.5
  Top Layer w0.5: C19.1 C18.1 ; SW2.1@9.735,-33.75 12.25,-33.75 v1(12.5,-34) ; R19.1 22.95,-12.2 Q1.2 ; U1.1 C6.1 ; R6.1 34.93,-16.67 35.707,-16.67 36,-16.377 36,-14 35.5,-13.5 ; U2.2 38.21,-13.04 39.25,-12 40.25,-12 40.75,-11.5 U2.5 41.875,-10.1 ; C7.2 41.65,-25.85 42.25,-25.25 ; 42,-7.25 41.875,-7.375 41.875,-10.1 ; U4.2 44.27,-12.27 43.019,-11.019 43.019,-10.119 U4.8 41.875,-10.1 ; P8.1@50.1,-1.95 52.586,-1.95 52.886,-1.65 53.714,-1.65 54.014,-1.95 56.5,-1.95 58.175,-1.95 P3.0@58.475,-1.65 ; 69.75,-8.75 69.925,-8.925 P3.6 ; P3.0@74.675,-11.25 74.75,-11.325 74.75,-15.25 ; C13.2 77.205,-39.355 77.955,-39.355 78.65,-40.05 78.65,-40.15 79.1,-40.6 C11.2 81.4,-40.6 81.5,-40.5 ; R33.1 89.45,-30 89.75,-30 91,-31.25
  Top Layer w0.7: esp1.15 41.95,-42.8 v1(42,-42.75)
  Top Layer w0.8: 25,-63 26.716,-63 esp1.38 ; esp1.1 45.75,-63 48.25,-63
  Top Layer w1: P9.6@5.45,-1.075 5.525,-1 8,-1 27,-1 ; P9.6@6.25,-3.75 6.25,-1.4 6.5,-1.15 ; P9.6@12.65,-3.75 13.05,-3.35 13.05,-2.707 13.093,-2.664 13.093,-1.5 13.443,-1.15 P9.6@13.45,-1.15
  Bottom Layer w0.3: U5.16 54.5,-32.5 ; U5.12 54,-30.5 ; U5.5 53.75,-27 54.5,-26.25
  other v1: 2,-63.5 21.5,-63.5 21.5,-62.5 23,-62.5 33.5,-57 36,-57 38.5,-57 2,-55.5 20,-55.5 24,-55.5 53.5,-55.5 66.5,-55.5 70,-55.5 81,-55.5 33.5,-54.5 36,-54.5 38.5,-54.5 53.5,-54 33.5,-52.5 36,-52.5 38.5,-52.5 81,-50 66.5,-48.5 70,-48.5 66,-45 8.5,-44.5 11.5,-44.5 69.75,-44 74.5,-44 2,-43 8.5,-43 11.5,-43 44,-42.75 33.5,-42.5 39.5,-42.5 14.5,-42 42,-41.5 44,-41.5 87,-41.5 89,-41.5 91,-41.5 83,-40.5 87,-39.5 89,-39.5 91,-39.5 33.5,-39 37.5,-39 83,-39 14.5,-38 87,-37.5 89,-37.5 91,-37.5 59,-36.5 66,-36.5 70,-36.5 14.5,-34 33,-34 37,-34 82.5,-33.5 88.5,-33.5 1.25,-33 1.25,-32 33,-31 37,-31 59,-30 66,-30 70,-30 88.5,-24.5 92,-24.5 59,-23.5 66,-23.5 70,-23.5 88.5,-23 92,-23 20.5,-22 88.5,-21.5 92,-21.5 20.5,-21 22,-21 3.25,-17.25 4.5,-17.25 4.5,-16.25 24,-16 25.5,-16 52,-13 55,-13 91.25,-13 24.5,-12.75 25.25,-12.75 82.25,-12.75 24.5,-12 25.25,-12 34,-11.75 34.75,-11.75 35.5,-11.75 30,-10.75 2.5,-10.25 3.5,-10.25 30,-9.75 13,-9.5 2.5,-8.5 3.5,-8.5 20.5,-7.5 13,-6.5 20.5,-6 51.343,-1.95 55.257,-1.95
  other v2: 85.155,-24.788
GPIO0: esp1.25 Q3.3 R30.1 R31.2 U3.1 | length 67.5
  Top Layer w0.3: v1(14.25,-44) 14.25,-64.75 15.25,-65.75 U3.1 ; R31.2 15.85,-21.1 16.15,-21.4 16.4,-21.4 17.75,-22.75 v1(17.75,-44) ; esp1.25 27.216,-44.034 v1(27.25,-44)
  Top Layer w0.5: Q3.3 R31.2@15.85,-21.1
  Bottom Layer w0.3: v1(14.25,-44) v1(17.75,-44) v1(27.25,-44)
GPIO2: esp1.24 U5.10 | length 36.5
  Top Layer w0.3: v1(30.5,-29.55) 30.52,-29.57 esp1.24
  Bottom Layer w0.3: v1@30.5,-29.5 U5.10
GPIO4: ADS1.15 esp1.26 R9.1 | length 32.3
  Top Layer w0.3: esp1.26 27.416,-47.06 27.94,-47.06 28.75,-46.25 v1(28.75,-36) ; v1(38.75,-36) R9.1 ; v1(45.25,-36) ADS1.15
  Bottom Layer w0.3: v1(28.75,-36) v1(38.75,-36) v1(45.25,-36)
GPIO5: esp1.29 P3.2 R2.4 R15.1 | length 93.7
  Top Layer w0.3: R15.1 12.75,-50.75 v1(13,-51) ; v1(23,-51) v1(23,-23) ; v1(26.25,-51) 26.28,-51.03 27.176,-51.03 esp1.29 ; R2.4 v1(64.75,-16.5) 65.5,-15.75 P3.2@65.5,-13.25
  Bottom Layer w0.3: v1(13,-51) v1(23,-51) v1(26.25,-51) ; v1(23,-23) 23,-22 28.5,-16.5 v1(64.75,-16.5)
GPIO12: ADS1.12 esp1.14 U5.14 | length 26.7
  Top Layer w0.3: v1(43.25,-38.75) 43.25,-38.669 43.345,-38.574 ADS1.12 43.345,-30.905 v1(43.75,-30.5) ; esp1.14 v1(45.25,-38.75)
  Bottom Layer w0.3: v1(43.25,-38.75) v1(45.25,-38.75) ; v1(43.75,-30.5) 43.75,-31 44.25,-31.5 U5.14
GPIO13: ADS1.14 esp1.16 U5.13 | length 25.3
  Top Layer w0.3: esp1.16 40.75,-44.43 v1(40.75,-39.75) ; v1(44.5,-39.75) 44.615,-39.635 ADS1.14 44.615,-30.716 44.75,-30.581 v1(44.75,-30.5)
  Bottom Layer w0.3: v1(40.75,-39.75) v1(44.5,-39.75) ; v1(44.75,-30.5) 45.25,-31 U5.13
GPIO14: ADS1.16 esp1.13 U5.11 | length 24.3
  Top Layer w0.3: esp1.13 46.245,-47.26 46.75,-46.755 46.75,-45 45.885,-44.135 ADS1.16 45.885,-31.115 v1(46.75,-30.25)
  Bottom Layer w0.3: v1(46.75,-30.25) 46.826,-30.25 47.076,-30 U5.11
GPIO15: esp1.23 U5.9 | length 36.1
  Top Layer w0.3: v1(31.75,-28.75) 31.79,-28.79 esp1.23
  Bottom Layer w0.3: v1(31.75,-28.75) 31.826,-28.75 32.076,-29 U5.9
GPIO18: esp1.30 P3.5 R2.2 U3.6 | length 109.7
  Top Layer w0.3: U3.6 10.475,-63.035 11.215,-63.035 12,-62.25 v1(12,-52.25) ; v1(24.5,-52.25) v1(24.5,-23) ; v1(26.25,-52.25) 27.126,-52.25 esp1.30 ; R2.2 64.75,-18.1 67.9,-18.1 68.825,-17.175 P3.5
  Bottom Layer w0.3: v1(12,-52.25) v1(24.5,-52.25) v1(26.25,-52.25) ; v1(24.5,-23) 29.5,-18 v1(64.75,-18)
GPIO19: esp1.31 P3.3 R2.3 U3.5 | length 108
  Top Layer w0.3: U3.5 v1@10.3,-53.5 ; v1(23.75,-53.5) v1(23.75,-23.5) ; v1(26.25,-53.5) 26.28,-53.53 27.136,-53.53 esp1.31 ; R2.3 65.25,-17.3 65.95,-17.3 66.5,-16.75 66.5,-12.5 P3.3
  Bottom Layer w0.3: v1(10.25,-53.5) v1(23.75,-53.5) v1(26.25,-53.5) ; v1(23.75,-23.5) 23.75,-22.5 29,-17.25 v1(65.25,-17.25)
GPIO21: esp1.33 P4.6 R12.1 | length 65.9
  Top Layer w0.3: esp1.33 27.316,-56.25 28.25,-56.25 28.5,-56.5 v1(28.5,-59) ; P4.6 82.75,-59.25 v1(83,-59) 84,-58 R12.1
  Bottom Layer w0.3: v1(28.5,-59) v1(83,-59)
GPIO22: esp1.36 P4.8 R13.1 | length 61.9
  Top Layer w0.3: esp1.36 27.437,-60.181 27.931,-60.181 28.251,-60.501 v1(28.5,-60.5) ; P4.8 83.75,-61 v1(84.25,-60.5) 84.75,-60 R13.1
  Bottom Layer w0.3: v1(28.5,-60.5) v1(84.25,-60.5)
GPIO23: esp1.37 P3.7 R2.1 U3.2 | length 109.7
  Top Layer w0.3: v1(15,-61.25) 15,-63.25 16.23,-64.48 U3.2 ; v1(25.25,-61.25) 25.27,-61.23 esp1.37 ; v1@25.25,-61.23 v1(25.25,-23.5) ; R2.1 65.25,-18.9 69.85,-18.9 71,-17.75 P3.7@71,-13.25
  Bottom Layer w0.3: v1(15,-61.25) v1(25.25,-61.25) ; v1(25.25,-23.5) 30,-18.75 v1(65.25,-18.75)
GPIO27: esp1.12 U1.7 | length 46.5
  Top Layer w0.3: U1.7 31.29,-19.79 v1@33.943,-22.443 ; v1(34,-22.5) v1@34.135,-22.5 ; esp1.12 46.22,-48.53 47.5,-47.25 v1(47.5,-22.5)
  Bottom Layer w0.3: v1(34,-22.5) v1(47.5,-22.5)
GPIO32: esp1.8 U1.6 | length 54.7
  Top Layer w0.3: U1.6 30.02,-19.77 v1(33.5,-23.25) ; esp1.8 45.39,-53.75 v1(46.25,-53.75) ; v1(48.25,-53.75) v1(48.25,-23.25)
  Bottom Layer w0.3: v1(33.5,-23.25) v1(48.25,-23.25) ; v1(46.25,-53.75) v1(48.25,-53.75)
GPIO33: esp1.9 R32.2 | length 22.1
  Top Layer w0.3: esp1.9 46.09,-52.34 v1(46.25,-52.5) ; R32.2 62.5,-47.8 v1(62.5,-52.5)
  Bottom Layer w0.3: v1(46.25,-52.5) v1(62.5,-52.5)
GPIO34: esp1.6 R17.2 | length 78.4
  Top Layer w0.3: v1(19.25,-37) 19.25,-17.9 22.4,-14.75 22.5,-14.75 22.9,-14.35 R17.2 ; esp1.6 45.4,-56 v1(46.25,-56) ; v1(49.75,-56) v1(49.75,-37)
  Bottom Layer w0.3: v1(19.25,-37) v1(49.75,-37) ; v1(46.25,-56) v1(49.75,-56)
GPIO35: esp1.7 U2.3 | length 53.1
  Top Layer w0.3: U2.3 39.48,-21.73 v1(39.5,-21.75) ; esp1.7 45.316,-54.814 46.105,-54.814 46.169,-54.75 v1(46.25,-54.75) ; v1(49,-54.75) v1(49,-21.75)
  Bottom Layer w0.3: v1(39.5,-21.75) v1(49,-21.75) ; v1(46.25,-54.75) v1(49,-54.75)
LDO_POWER: C4.1 D?.1 U1.5 | length 6.7
  Top Layer w0.5: D?.1 27.85,-24.5 28.2,-24.15 28.2,-24.05 28.643,-23.607 28.643,-22.357 28.75,-22.25 U1.5
LINE+: D1.1 P1.1 R4.2 | length 6.4
  Top Layer w0.7: P1.1 29.25,-3.56 D1.1 R4.2
NC: P4.3
NetC1_1: C1.1 C3.1 R1.2 U1.4 | length 12
  Top Layer w0.7: C1.1 26.75,-17.5 28.75,-15.5 28.75,-14.375 ; C3.1 28.625,-14.25 28.75,-14.375 ; R1.2 27.9,-10.35 28.1,-10.55 28.2,-10.55 28.75,-11.1 U1.4 28.75,-14.375
NetC6_2: C6.2 U1.3 | length 6.4
  Top Layer w0.5: U1.3 30.02,-14.77 30.4,-15.15 C6.2
NetC16_1: C16.1 U6.8 | length 2
  Top Layer w0.5: C16.1 81.273,-22.076 U6.8
NetC16_2: C16.2 D2.2 L1.1 U6.1 | length 14
  Top Layer w0.5: L1.1 L1.1@79.95,-30.293 ; C16.2 79.643,-24 79.35,-24.293 79.35,-24.35 78.9,-24.8 79.95,-25.85 L1.1@79.95,-30.293 ; U6.1 83.25,-27.912 83.15,-28.013 82.937,-28.013 81.607,-29.343 80.9,-29.343 L1.1@79.95,-30.293
NetC22_1: C22.1 U6.3 | length 2.5
  Top Layer w0.5: U6.3 85.79,-29.04 86.05,-29.3 86.05,-29.4 86.35,-29.7 C22.1
NetC22_2: C22.2 R33.2 | length 2.7
  Top Layer w0.5: C22.2 R33.2
NetCH1_2: CH1.2 R28.2 | length 3.9
  Top Layer w0.5: R28.2 5.6,-20 5.9,-19.7 5.9,-19.6 6,-19.5 6,-19 6.44,-18.56 CH1.2
NetCH1_7: CH1.7 XTAL1.2 | length 8.9
  Top Layer w0.5: CH1.7 12.79,-18.04 13.25,-18.5 17.25,-18.5 17.75,-18 XTAL1.2
NetCH1_8: CH1.8 XTAL1.1 | length 6.9
  Top Layer w0.5: CH1.8 14.06,-14.94 17.75,-11.25 XTAL1.1
NetD1_2: D1.2 R1.1 | length 2.3
  Top Layer w0.7: D1.2 26,-8.1 R1.1
NetLED1_1: LED1.1 R20.1 | length 2
  Top Layer w0.5: R20.1 LED1.1
NetP2_1: P2.1 R3.2 U2.6 | length 7.4
  Top Layer w0.6: P2.1 39.94,-5.5 R3.2 ; U2.6 R3.2@39.48,-8
NetP2_2: P2.2 R3.1 U2.7 | length 8.3
  Top Layer w0.6: P2.2 34.398,-3.768 34.398,-4.358 37.69,-7.65 37.79,-7.65 38.04,-7.9 R3.1 38.21,-8.17 U2.7
NetP6_1: P6.1 R14.1 U4.6 | length 7
  Top Layer w0.5: U4.6@45.5,-10 45.5,-4.75 P6.1
NetP6_2: P6.2 R14.2 U4.7 | length 7
  Top Layer w0.5: P6.2 44.23,-4.79 U4.7@44.23,-10
NetP7_1: P7.1 Q1.3 | length 5.1
  Top Layer w0.7: P7.1 22,-5.06 Q1.3
NetQ1_1: Q1.1 R17.1 R19.2 | length 4
  Top Layer w0.7: R17.1 21.05,-14.2 Q1.1
NetQ2_1: Q2.1 R21.2 | length 2
  Top Layer w0.5: R21.2 Q2.1
NetQ3_1: Q3.1 R22.2 | length 2.9
  Top Layer w0.3: R22.2 7.9,-21.5 8.15,-21.5 9.075,-20.575 9.075,-20.3 9.225,-20.15 Q3.1
NetQ4_1: Q4.1 R32.1 R34.2 | length 4
  Top Layer w0.5: R32.1 R34.2 Q4.1
NetR4_1: R4.1 R5.2 U1.2 | length 6.1
  Top Layer w0.5: U1.2 31.309,-13.231 31.309,-12.191 32.85,-10.65 33.15,-10.35 33,-10.2 R4.1
NetR6_2: R6.2 U1.8 | length 2.7
  Top Layer w0.5: U1.8 32.56,-18.704 32.606,-18.75 R6.2
NetR7_2: R7.2 U3.7 | length 2.7
  Top Layer w0.5: R7.2 8.1,-63.5 8.6,-64 9,-64 9.405,-64.405 10.225,-64.405 U3.7
NetR8_2: R8.2 U3.3 | length 2.4
  Top Layer w0.5: U3.3 19.46,-63.21 R8.2
NetR23_1: R23.1 U6.2 | length 2.2
  Top Layer w0.5: U6.2 84.52,-29.67 R23.1
NetR24_1: R24.1 R25.2 U6.4 | length 4.8
  Top Layer w0.5: U6.4 87.06,-27.088 87.16,-26.987 87.573,-26.987 88.175,-26.385 88.865,-26.385 R25.2 R24.1
NetR27_1: R27.1 SW1.2 | length 26.1
  Top Layer w0.5: SW1.2@9.735,-36.25 v1(11.5,-36.25) ; v1(15.75,-36.25) R27.1
  Bottom Layer w0.5: v1(0.5,-36.25) v1(11.5,-36.25) v1(15.75,-36.25)
NetR29_2: R29.2 U6.6 | length 2.6
  Top Layer w0.5: U6.6 85.79,-19.81 R29.2
NetR31_1: R31.1 SW2.2 | length 22
  Top Layer w0.3: v1(15.75,-24) R31.1
  Top Layer w0.5: SW2.2@9.735,-29.25 v1(11.5,-29.25)
  Bottom Layer w0.3: v1(11.5,-29.25) 13.5,-29.25 15.75,-27 v1(15.75,-24)
  Bottom Layer w0.5: v1(0.5,-29.25) v1(11.5,-29.25)
RTS: CH1.14 Q2.2 R22.1 | length 22.2
  Top Layer w0.3: v1(7,-27.5) 7.057,-27.557 7.057,-27.807 7.5,-28.25 8.75,-28.25 9.5,-27.5 Q2.2 ; R22.1 7.75,-19.75 v1(7.75,-18.75) ; CH1.14 7.71,-13.21 v1(7.75,-13.25)
  Bottom Layer w0.3: v1(7,-27.5) 7,-19.5 v1(7.75,-18.75) v1(7.75,-13.25)
RXD0: esp1.34 R28.1 | length 56.9
  Top Layer w0.3: R28.1 5.6,-21.9 6,-22.3 v1(6,-57.25) ; v1(26.25,-57.25) 26.28,-57.28 27.076,-57.28 esp1.34
  Bottom Layer w0.3: v1(6,-57.25) v1(26.25,-57.25)
SENSOR_VN: esp1.5 P5.1 | length 25.5
  Top Layer w0.3: esp1.5 45.33,-57.5 v1(46.25,-57.5) ; v1(60.5,-57.5) 60.5,-65.38 P5.1@62.12,-67
  Bottom Layer w0.3: v1(46.25,-57.5) v1(60.5,-57.5)
SENSOR_VP: esp1.4 P5.2 | length 23.5
  Top Layer w0.3: esp1.4 46.56,-58.69 v1(47,-58.25) ; P5.2@59.58,-67 59.58,-58.501 59.75,-58.331 v1(59.75,-58.25)
  Bottom Layer w0.3: v1(47,-58.25) v1(59.75,-58.25)
"TOCH 1": ADS1.2 U5.1 | length 10.4
  Top Layer w0.3: ADS1.2 45.25,-25.75 v1(46.75,-24.25)
  Bottom Layer w0.3: v1(46.75,-24.25) 47.5,-25 U5.1
"TOCH 2": ADS1.3 U5.2 | length 11.5
  Top Layer w0.3: ADS1.3 44.615,-25.385 v1(45.75,-24.25)
  Bottom Layer w0.3: v1(45.75,-24.25) 47,-25.5 U5.2
"TOCH 3": ADS1.4 U5.3 | length 12.5
  Top Layer w0.3: ADS1.4 43.98,-25.02 v1(44.75,-24.25)
  Bottom Layer w0.3: v1(44.75,-24.25) 46.5,-26 U5.3
"TOCH 4": ADS1.5 U5.4 | length 13.6
  Top Layer w0.3: ADS1.5 43.345,-24.655 v1(43.75,-24.25)
  Bottom Layer w0.3: v1(43.75,-24.25) 46,-26.5 U5.4
TOUCH-IRQ: ADS1.11 R11.2 | length 4.6
  Top Layer w0.3: R11.2 40.25,-31.75 41.75,-31.75 ; 41.751,-31.749 41.999,-31.749 ; 42,-31.75 42.5,-31.75 42.71,-31.96 ADS1.11
TOUCH_INT: P4.2
TOUCH_RESET: C8.2 P4.4 R10.1 | length 12.2
  Top Layer w0.3: P4.4 81.75,-57.75 83.5,-56 R10.1 ; R10.1 C8.2
TXD0: CH1.3 esp1.35 | length 59.7
  Top Layer w0.3: CH1.3 7.735,-16.525 7.735,-17.735 8.25,-18.25 11.25,-18.25 12.5,-19.5 16.75,-19.5 18.5,-21.25 v1(18.5,-58.75) ; v1(26.25,-58.75) 26.28,-58.72 27.186,-58.72 esp1.35
  Bottom Layer w0.3: v1(18.5,-58.75) v1(26.25,-58.75)
VCC_5V: C11.1 C13.1 D4.2 D5.2 D?.2 LF1.1 P5.4 | length 180.3
  Top Layer w0.5: v1(0.75,-27.5) v1(0.75,-18) ; v1(0.75,-6.5) D4.2 ; v1(5,-31) v1(5,-27.5)
  Top Layer w0.7: v1(26.25,-27) 26.9,-27 D?.2 ; v1(35.75,-27) v1(35.75,-20.75) ; v1(68.25,-65.5) 68.25,-41.69 ; v1(68.25,-20.75) 68.25,-41.69 ; D5.2@73.05,-42.1 D5.2 68.66,-42.1 68.25,-41.69
  Top Layer w1: D5.2@73.05,-42.1 73.25,-41.9 75.2,-39.95 75.2,-37.821 75.786,-37.236 76.914,-37.236 C13.1 C11.1 80.2,-37.2 80.45,-37.45 LF1.1
  Bottom Layer w0.5: v1(0.75,-27.5) v1(5,-27.5) ; v1(0.75,-18) v1(0.75,-6.5)
  Bottom Layer w0.7: v1(5,-31) 13.75,-31 17.75,-27 v1(26.25,-27) v1(35.75,-27) ; v1(35.75,-20.75) v1(68.25,-20.75) ; P5.4 56.25,-65.5 v1(68.25,-65.5)
VCC_USB: C17.1 D4.1 P9.4 | length 5.5
  Top Layer w0.4: D4.1 7.25,-6.15 7.75,-5.65 8.35,-5.65 8.813,-5.187 8.813,-4.738 8.8,-4.725 P9.4
  Top Layer w0.8: C17.1@7.334,-9.02 D4.1@7.334,-6.752
VIN: C20.1 D3.2 R23.2 U6.7 | length 27.9
  Top Layer w0.5: v1(83.2,-31.7) 84.45,-31.7 R23.2
  Top Layer w1: D3.2 78.8,-17.7 79,-17.5 79,-17.15 80.95,-15.2 C20.1 84.45,-15.55 84.5,-15.6 v1@84.5,-20.43 ; v1@84.5,-20.47 84.5,-22.056 U6.7
  Bottom Layer w0.5: v1(83.2,-31.7) 82.45,-30.95 82.45,-22.52 v1(84.52,-20.45)
pads on no net: ADS1.7 ADS1.8 ADS1.13 CH1.9 CH1.10 CH1.11 CH1.12 CH1.15 esp1.17 esp1.18 esp1.19 esp1.20 esp1.21 esp1.22 esp1.32 P3.1 P3.8 P3.9 P4. P8.0 P9.1 P10.2 P10.4 U4.5 U5. U5.8 U5.17 U5.18 U5.19 U5.20 U5.21 U5.22 U5.23 U5.24 U5.25 U5.26 U5.27 U5.28 U5.29 U5.30 U5.31 U5.32

## Polygon pours and split planes (outlines as drawn)
GND on Top Layer "GND_L01_P000" (solid, remove dead copper, pour order 0): 0,0 93,0 93,-70 0,-70
GND on Bottom Layer "GND_L02_P001" (solid, remove dead copper, pour order 1): 0,0 93,0 93,-70 0,-70

## Keep-outs
Keep-Out Layer:
  the board outline again, w0.1

## Other copper
Top Layer:
  rectangle net GND: 41.5,-43.5 44.5,-41
  rectangle net GND: 88.5,-30.25 90,-27.5
  rectangle net GND: 86.75,-25 89.5,-23.5
  rectangle net GND: 74.25,-14.75 75.25,-12
  rectangle net GND: 41.95,-25.55 42.75,-23
  rectangle net GND: 39.25,-26.5 42.75,-25.25
  rectangle net GND: 33.75,-14 36,-11.25
  rectangle net GND: 29.5,-11 31.75,-9.5
  rectangle net GND: 24.25,-15 25.5,-11.5
  rectangle net GND: 22.5,-13 25.5,-11.5
  rectangle net GND: 3.5,-9.75 6,-8.25
  rectangle net GND: 2.25,-12.25 4,-8.25
  rectangle net GND: 2.75,-17.75 5.5,-15.75
  rectangle net GND: 0.5,-34 2.25,-31.5
  pour cut-out: 28.5,-45 44.14,-45 44.2,-44.94 44.2,-46.8 44,-47 44,-46 43.5,-46.5 28.5,-46.5
  pour cut-out: 45,-45.5 45,-63.5 44,-63.5 44,-45.5
  pour cut-out: 27,-43
  pour cut-out: 27,-63.5 28.5,-63.5 28.5,-43 27,-43
  pour cut-out: 46.75,-63.25 46.75,-70 25.75,-70 25.75,-63.25
Bottom Layer:
  pour cut-out: 46.75,-63.25 46.75,-70 25.75,-70 25.75,-63.25

## Silkscreen, mask and mechanical layers (free items; w line width, h text height)
Bottom Overlay:
  lines w0.1: 0,-65 93,-65 93,-5 0,-5 0,-65
Mechanical 13:
  lines w0.254: 0,-73.004 0,-72.496 ; 1.8,-73.35 0,-72.75 ; 1.8,-72.15 0,-72.75 ; 43.224,-72.75 0,-72.75 ; 49.776,-72.75 93,-72.75 ; 91.2,-73.35 93,-72.75 ; 91.2,-72.15 93,-72.75 ; 93,-73.004 93,-72.496 ; 94.9,-68.2 95.5,-70 ; 94.9,-1.8 95.5,0 ; 95.246,-70 95.754,-70 ; 95.246,0 95.754,0 ; 95.5,-38.268 95.5,-70 ; 95.5,-31.732 95.5,0 ; 96.1,-68.2 95.5,-70 ; 96.1,-1.8 95.5,0
  text "70 (mm)" at 96.257,-38.014 h1.8 r90
  text "93 (mm)" at 43.478,-73.507 h1.8

## Text inside footprints (layer, text, board x,y; h text height)
U5: Bottom Overlay "40" at 51.145,-46.25 h1.5 r270